# Altium PCB EQ.PcbDoc
Units mm, origin at the board's own origin, x right, y up, seen from the top; angles counter-clockwise.
Board outline 56.7 x 64.3 mm, 2 copper layers (Top Layer, Bottom Layer); 61 components, 38 nets, 171 pads, 13 vias.
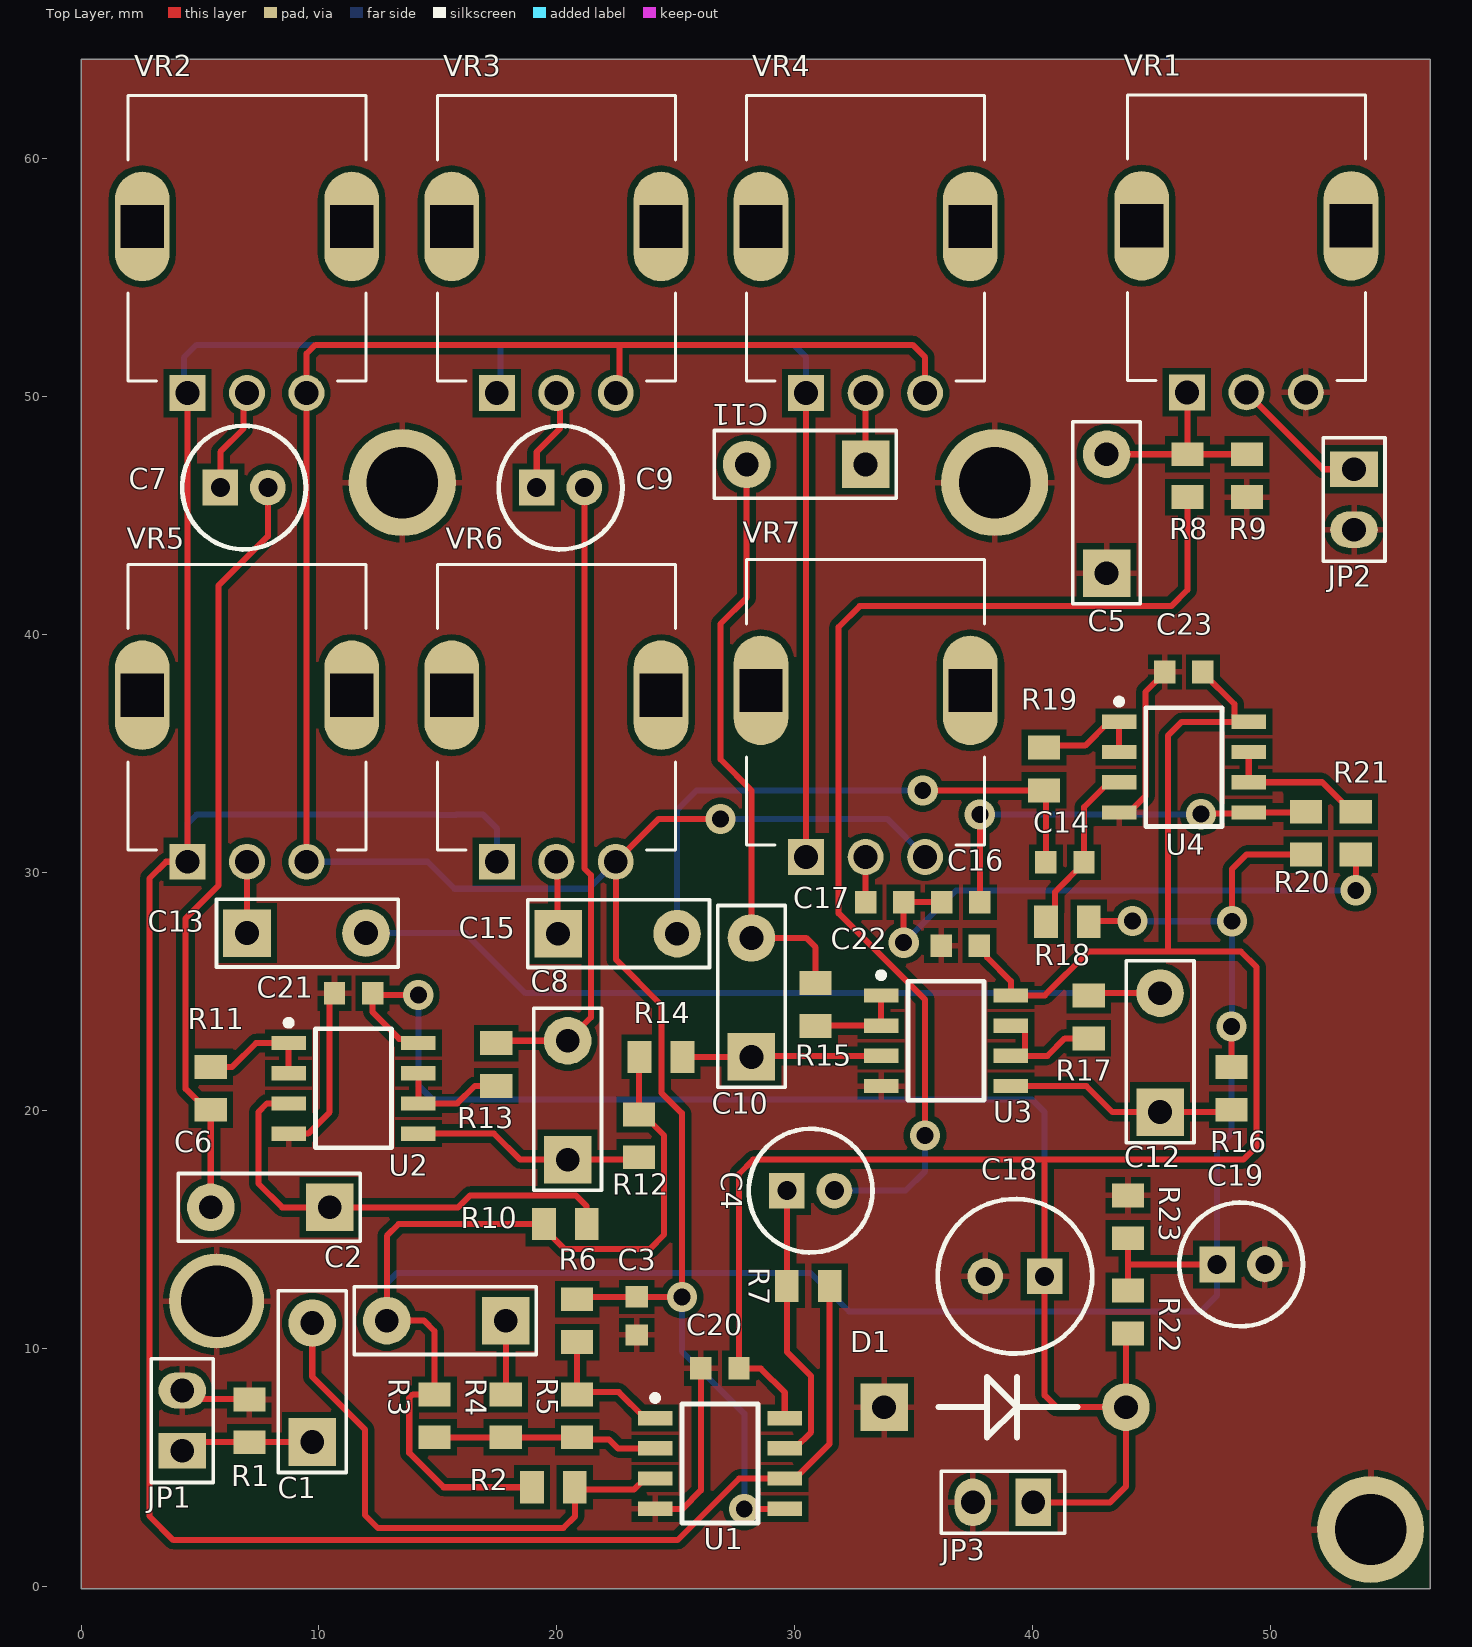
[diagram p0: Top Layer view]
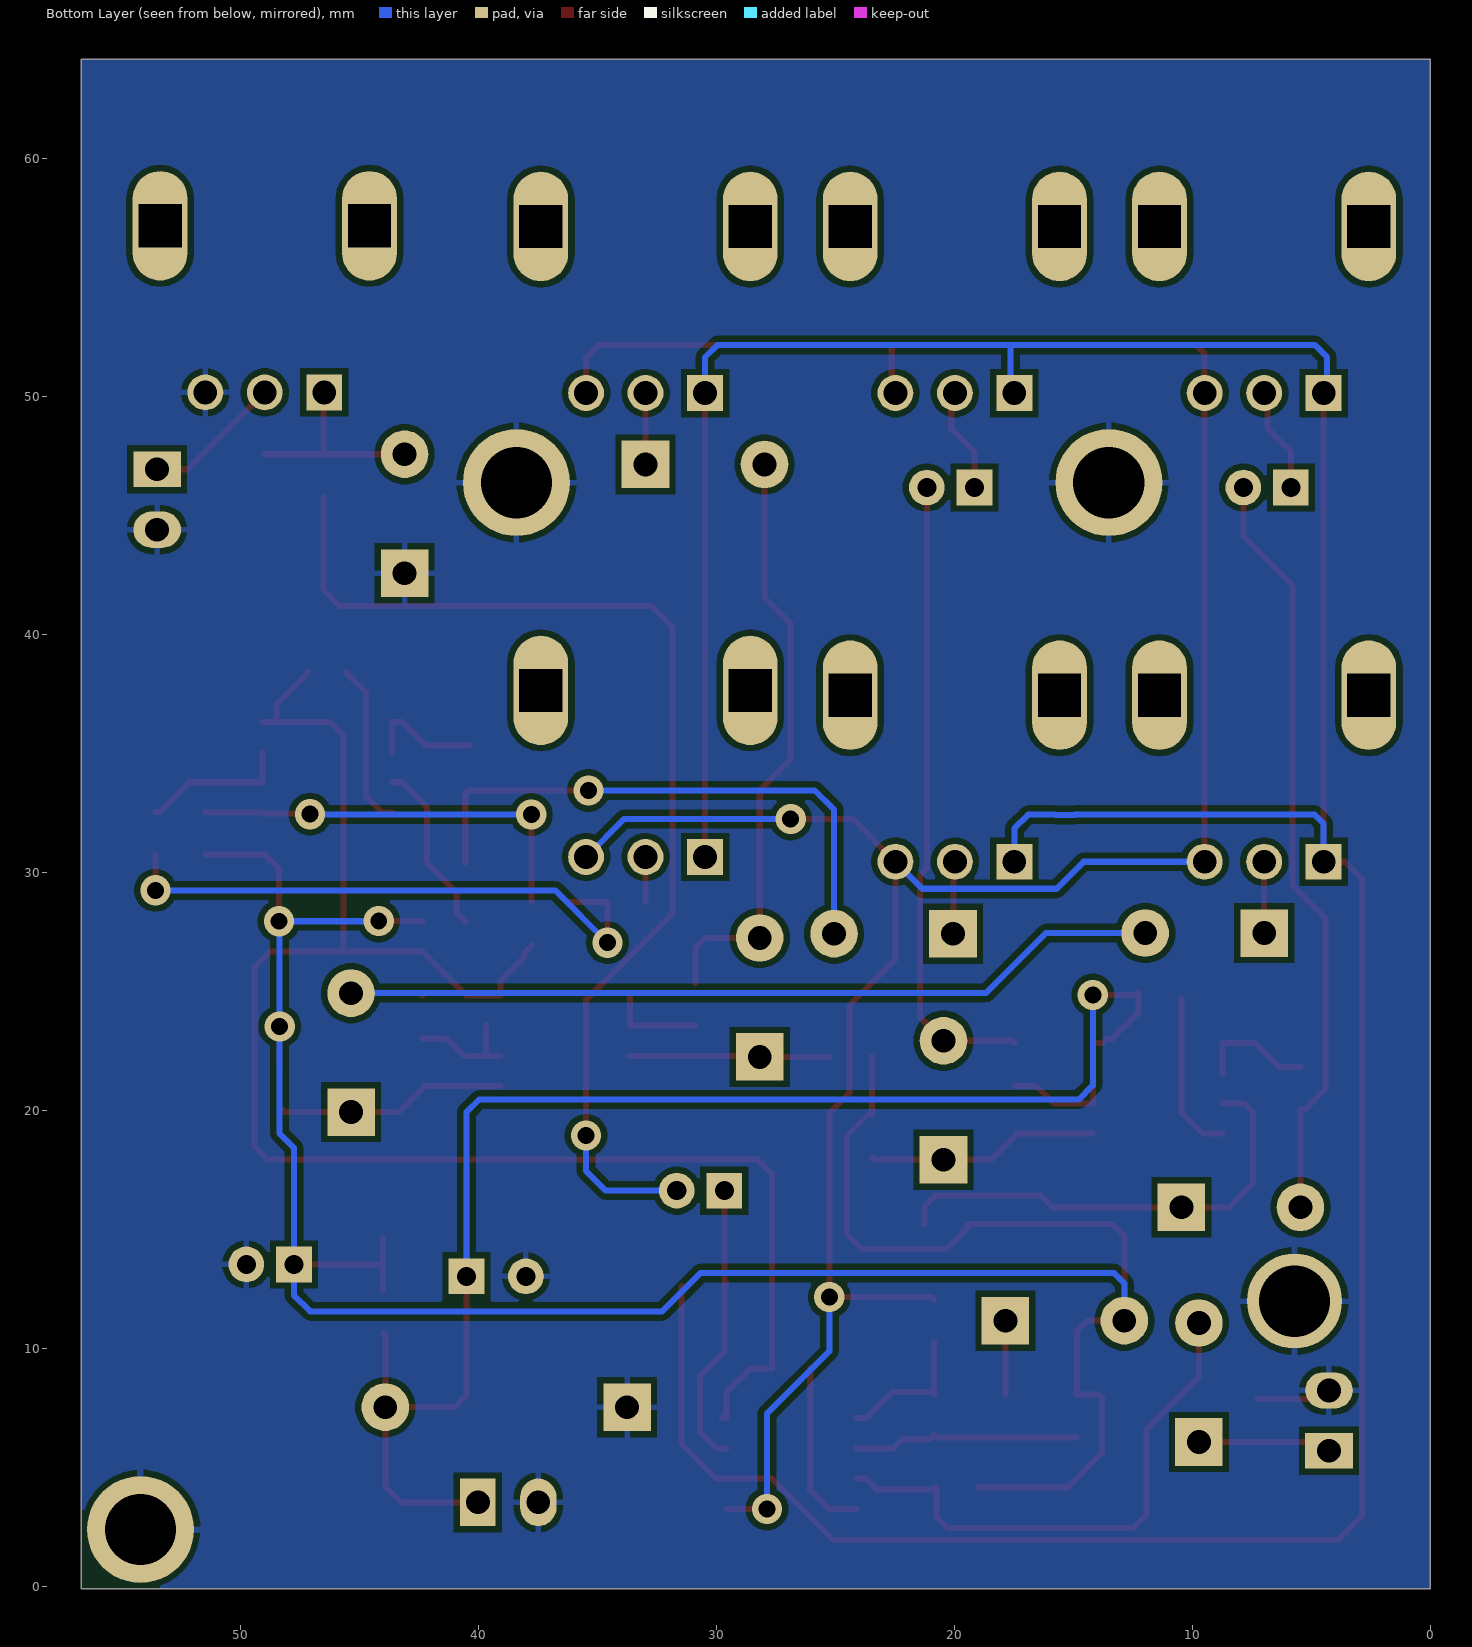
[diagram p1: Bottom Layer view, seen from below]
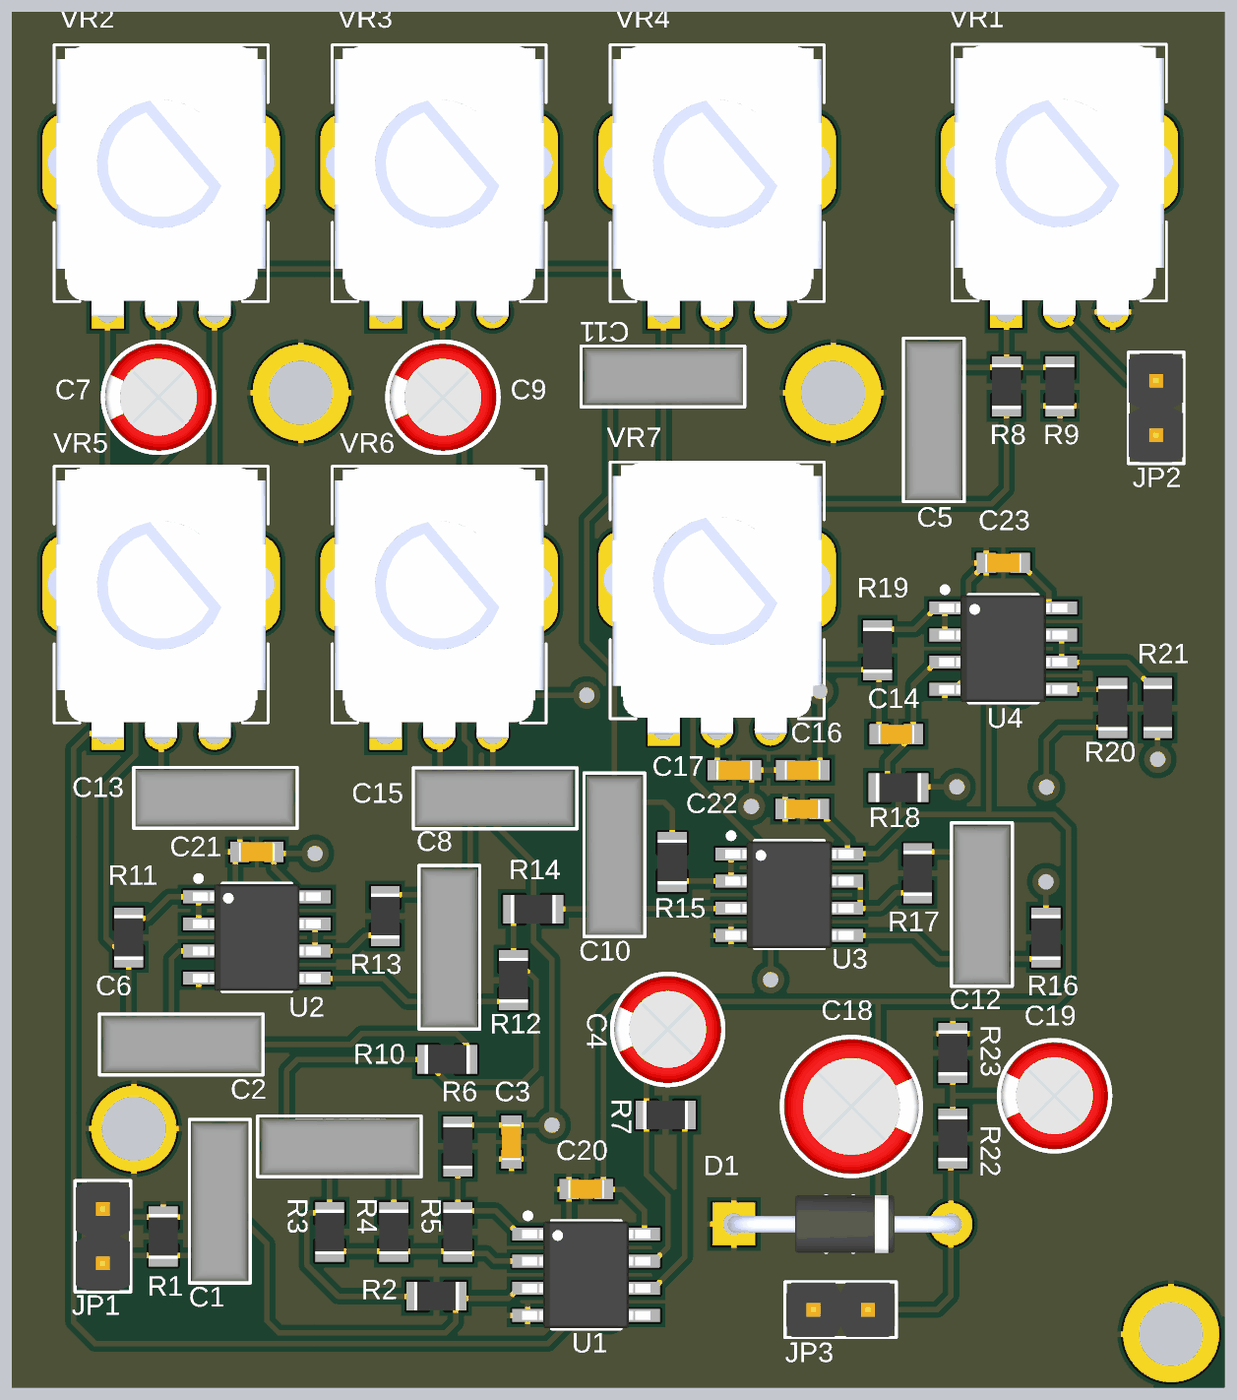
[diagram p2: 3D render of the assembled board from above, using the file's embedded part models]

## Layer stack, top to bottom
Top Solder: solder mask 0.0102, Solder Resist, Dk 3.5
Top Layer: signal copper 0.0356
Dielectric 1: dielectric 0.32, FR-4, Dk 4.8
Bottom Layer: signal copper 0.0356
Bottom Solder: solder mask 0.0102, Solder Resist, Dk 3.5

## Board outline
0,-0.1 0,64.2 56.7,64.2 56.7,-0.1

## Design rules (kind name [scope] priority, off if disabled: settings)
Clearance [All] p1: gap=0.254 ignorepadtopadclearanceinfootprint=FALSE except(0: Arc-Hole Track-Hole SMDPad-Hole THPad-Hole Via-Hole Fill-Hole Poly-Hole Region-Hole Text-Hole)
HoleSize [All] p1: absolutevalues=TRUE maxlimit=5 minlimit=0.025 maxpercent=80.000 minpercent=20.000
PolygonConnect [All] p1: connectstyle=Relief reliefconductorwidth=0.254 reliefentries=4 polygonreliefangle="90 Angle" airgapwidth=0.254
RoutingVias [All] p1: holewidth=0.711 width=1.27 viastyle="Through Hole" minholewidth=0.711 minwidth=1.27 maxholewidth=0.711 maxwidth=1.27
SilkToSolderMaskClearance [IsPad] p1: minsilkscreentomaskgap=0.2 clearancetoexposedcopper=TRUE
SolderMaskExpansion [All] p1: expansion=0.102 istentingtop=FALSE
SupplyNets "Schematic Supply Nets_2" [InNet('VCC/2')] p1: voltage=0.000
SupplyNets "Schematic Supply Nets_1" [InNet('GND')] p2: voltage=0.000
SupplyNets "Schematic Supply Nets" [InNet('VCC')] p3: voltage=0.000
Width [All] p1: maxlimit=0.254 minlimit=0.254 preferedwidth=0.254
28 further rules are at their usual default settings.

## Classes and differential pairs
component class EQ: C1 C2 C3 C4 C5 C6 C7 C8 C9 C10 C11 C12 C14 C15 C22 C23 D1 JP1 JP2 JP3 R1 R2 R3 R4 R5 R6 R7 R8 R9 R10 R11 R12 R13 R14 R15 R16 R17 R18 R19 R22 R23 U1 U2 U3 U4 VR1 VR2 VR3 VR4 VR5 VR6 VR7

## Components (designator, comment, footprint, x,y, rotation, side; value= is the part's Value field where it differs from the comment)
C1 "10nF" CAP_FILM 9.717,6.075 r90 top
C2 "10nF" CAP_FILM 17.852,11.175 r180 top
C3 "150pF" CAP_0603 23.352,11.375 r270 top
C4 "1uF" CAP_TH 30.663,16.64 r180 top
C5 "10nF" CAP_FILM 43.102,42.59 r90 top
C6 "47nF" CAP_FILM 10.452,15.94 r180 top
C7 "2.2uF" CAP_TH 6.852,46.19 r180 top
C8 "33nF" CAP_FILM 20.452,17.94 r90 top
C9 "1uF" CAP_TH 20.152,46.19 r180 top
C10 "6.8nF" CAP_FILM 28.175,22.263 r90 top
C11 "150nF" CAP_FILM 32.975,47.163 r180 top
C12 "3.3nF" CAP_FILM 45.352,19.94 r90 top
C13 "68nF" CAP_FILM 6.975,27.463 r0 top
C14 "680pF" CAP_0603 41.352,30.44 r180 top
C15 "22nF" CAP_FILM 20.052,27.44 r0 top
C16 "180pF" CAP_0603 36.975,28.763 r180 top
C17 "1nF" CAP_0603 33.775,28.763 r0 top
C18 "100uF" CAP_100uF 39.252,13.04 r0 top
C19 "47uF" CAP_TH 48.752,13.54 r180 top
C20 "100nF" CAP_0603 26.852,9.175 r180 top
C21 "100nF" CAP_0603 11.452,24.94 r180 top
C22 "100nF" CAP_0603 36.952,26.94 r180 top
C23 "100nF" CAP_0603 46.352,38.44 r180 top
D1 "1N4001" 1N4001 33.752,7.54 r0 top
JP1 "INPUT" Header_2 4.252,6.975 r90 top
JP2 "OUTPUT" Header_2 53.502,45.69 r270 top
JP3 "Alimentation" Header_2 38.752,3.54 r180 top
R1 "2.2M" RES_0805 7.075,6.963 r270 top
R2 "470K" RES_0805 19.852,4.175 r180 top
R3 "10K" RES_0805 14.852,7.175 r90 top
R4 "1K" RES_0805 17.852,7.175 r90 top
R5 "10K" RES_0805 20.852,7.175 r270 top
R6 "10K" RES_0805 20.852,11.175 r270 top
R7 "10K" RES_0805 30.563,12.64 r180 top
R8 "10K" RES_0805 46.502,46.69 r270 top
R9 "10K" RES_0805 49.002,46.69 r270 top
R10 "120k" RES_0805 20.352,15.24 r0 top
R11 "470R" RES_0805 5.452,20.94 r90 top
R12 "100k" RES_0805 23.452,18.94 r270 top
R13 "470R" RES_0805 17.452,21.94 r270 top
R14 "100K" RES_0805 24.375,22.263 r0 top
R15 "1K" RES_0805 30.875,24.463 r270 top
R16 "100K" RES_0805 48.352,20.94 r270 top
R17 "1K" RES_0805 42.352,23.94 r270 top
R18 "100K" RES_0805 41.452,27.94 r180 top
R19 "1K" RES_0805 40.475,34.363 r90 top
R20 "100K" RES_0805 51.475,31.663 r90 top
R21 "1K" RES_0805 53.575,31.663 r90 top
R22 "47K" RES_0805 44.002,11.54 r90 top
R23 "47K" RES_0805 44.002,15.54 r90 top
U1 "TL072" TL072 26.852,5.175 r0 top
U2 "" TL072 11.452,20.94 r0 top
U3 "TL072" TL072 36.352,22.94 r0 top
U4 "TL072" TL072 46.352,34.44 r0 top
VR1 "POT" PT01-D120D-B503 48.977,57.19 r0 top
VR2 "POT" PT01-D120D-B503 6.975,57.163 r0 top
VR3 "POT" PT01-D120D-B503 19.975,57.163 r0 top
VR4 "POT" PT01-D120D-B503 32.975,57.163 r0 top
VR5 "POT" PT01-D120D-B503 6.975,37.463 r0 top
VR6 "POT" PT01-D120D-B503 19.975,37.463 r0 top
VR7 "POT" PT01-D120D-B503 32.975,37.663 r0 top

## Footprints (in the part's own frame and the unit in brackets; to place one, negate y for a bottom-side part, rotate by r counter-clockwise, add the part's x,y. Pads: shape width x height; smd on the part's side, far side on the other; paste and mask are expansions set on the pad)
1N4001 [mm]
  rect 2x2 hole 1: 1(0,0)
  round 2 hole 1: 2(10.16,0)
  silkscreen extent 2.29,-1.27 8.13,1.27, body extent -0.28,-1.35 10.67,1.35, height 2.78
CAP_100uF [mm]
  rect 1.5x1.5 hole 0.8: 1(1.25,0)
  round 1.5 hole 0.8: 2(-1.25,0)
  silkscreen extent -3.25,-3.25 3.25,3.25, body extent -3.14,-3.14 3.14,3.15, height 11.04
CAP_0603 [mm]
  rect 0.9x0.95 smd: 1(-0.8,0) 2(0.8,0)
  body extent -0.85,-0.45 0.85,0.45, height 0.55
CAP_FILM [mm]
  rect 2x2 hole 1: 1(0,0)
  round 2 hole 1: 2(5,0)
  silkscreen extent -1.28,-1.42 6.36,1.42, body extent -1.2,-1.3 6.2,1.31, height 6.6
CAP_TH [mm]
  rect 1.5x1.5 hole 0.8: 1(1,0)
  round 1.5 hole 0.8: 2(-1,0)
  silkscreen extent -2.6,-2.6 2.6,2.6, body extent -2.5,-2.5 2.49,2.5, height 11.04
Header_2 [mm]
  rect 1.5x2 hole 1: 1(-1.27,0)
  oval 1.524x2 hole 1: 2(1.27,0)
  silkscreen extent -2.6,-1.3 2.6,1.3, body extent -2.54,-1.27 2.54,1.27, height 8.54
PT01-D120D-B503 [mm]
  rect 1.508x1.508 hole 1: 1(-2.5,-7)
  round 1.508 hole 1: 2(0,-7) 3(2.5,-7)
  oval 2.3x4.6 hole 1.8 square: S1(-4.4,0) S2(4.4,0)
  silkscreen extent -5,-6.5 5,5.5, body extent -5.64,-7.21 5.64,5.44, height 15.1
RES_0805 [mm] "Chip Resistor, 2-Leads, Body 2.00x1.25mm, IPC Medium Density"
  rect 1x1.35 smd: 1(-0.9,0) 2(0.9,0)
  body extent -1.05,-0.67 1.05,0.67, height 0.6
TL072 [mm] "SOIC, 8-Leads, Body 4.91x3.90mm, Pitch 1.27mm, IPC Medium Density"
  rect 1.45x0.6 smd: 1(-2.725,1.905) 2(-2.725,0.635) 3(-2.725,-0.635) 4(-2.725,-1.905) 5(2.725,-1.905) 6(2.725,-0.635) 7(2.725,0.635) 8(2.725,1.905)
  silkscreen extent -2.85,-2.5 1.6,2.88, body extent -3,-2.5 3,2.5, height 1.75

## Part data
C1 C2 C3 C5 C6 C8 C10 C11 C12 C13 C14 C15 C16 C17 C20 C21 C22 C23: library part "CAP NP"
C4 C7 C9 C18 C19: library part CAP
D1: library part DIODE
JP1 JP2 JP3: library part "HEADER 2"
R1 R2 R3 R4 R5 R6 R7 R8 R9 R10 R11 R12 R13 R14 R15 R16 R17 R18 R19 R20 R21 R22 R23: library part R
U2: library part TL072

## Free pads (board coordinates)
  round 4 hole 3: 6(5.7,12)
  round 4.5 hole 3: 6(13.5,46.4) 6(38.4,46.4) 6(54.2,2.4)

## Via types
v1: diameter 1.27, hole 0.711, Top Layer to Bottom Layer, tented both sides, 13 vias

## Nets (pads, with @x,y where several pads share a name; then routed paths per layer and width w, separated by ;. In a path a pad name is that pad's centre, name@x,y a point inside that pad or via, vN(x,y) a via of type N, cw(c..) or ccw(c..) an arc to the next point about the centre after c; other vN are vias at no path point)
1kHz: C13.1 VR5.2 | length 3.2
  Top Layer w0.254: VR5.2@6.827,30.44 6.975,30.292 6.975,27.763 C13.1@7.275,27.463
4kHz: C15.1 VR6.2 | length 3
  Top Layer w0.254: VR6.2@20.027,30.44 20.027,27.465 C15.1
8kHz: C17.1 VR7.2 | length 1.9
  Top Layer w0.254: C17.1 VR7.2
62.5Hz: C7.1 VR2.2 | length 4.4
  Top Layer w0.254: C7.1 5.852,47.69 6.827,48.665 VR2.2@6.827,50.19
125Hz: C9.1 VR3.2 | length 4.4
  Top Layer w0.254: C9.1 19.152,47.69 20.127,48.665 VR3.2@20.127,50.163
500Hz: C11.1 VR4.2 | length 3
  Top Layer w0.254: C11.1 VR4.2
EQ+: C3.1 R6.1 U1.5 VR2.3 VR3.3 VR4.3 VR5.3 VR6.3 VR7.3 | length 115.4
  Top Layer w0.254: VR5.3 VR2.3 9.475,51.813 9.852,52.19 22.627,52.19 ; R6.1 20.952,12.175 C3.1 23.362,12.165 v1(25.252,12.165) 25.252,19.894 24.394,20.752 24.394,24.444 22.475,26.363 VR6.3 24.275,32.263 v1(26.875,32.263) ; VR3.3@22.627,50.19 22.627,52.19 ; v1(27.875,3.263) 27.878,3.267 29.574,3.267 U1.5 ; VR4.3 35.475,51.663 34.948,52.19 22.627,52.19
  Bottom Layer w0.254: VR5.3 14.562,30.463 15.697,29.328 21.34,29.328 VR6.3 ; v1(25.252,12.165) 25.252,9.886 27.875,7.263 27.875,3.444 27.694,3.263 v1(27.875,3.263) ; v1(26.875,32.263) 33.875,32.263 VR7.3
EQ-: R7.1 U1.6 VR2.1 VR3.1 VR4.1 VR5.1 VR6.1 VR7.1 | length 153.2
  Top Layer w0.254: VR2.1 VR5.1 3.575,30.463 2.871,29.759 2.871,2.967 3.883,1.955 25.067,1.955 27.652,4.54 U1.6 30.002,4.54 31.463,6.001 R7.1 ; VR7.1 VR4.1
  Bottom Layer w0.254: VR2.1@4.327,50.19 4.327,51.665 4.852,52.19 17.627,52.19 ; VR5.1 4.475,32.063 4.852,32.44 14.915,32.44 14.931,32.424 15.773,32.424 15.789,32.44 16.898,32.44 17.475,31.863 VR6.1 ; VR3.1@17.627,50.19 17.627,52.19 ; VR4.1 30.475,51.663 29.948,52.19 17.627,52.19
GND: C3.2 C5.1 C18.2 C19.2 C20.2 C21.2 C22.2 C23.2 D1.1 JP1.2 JP2.2 JP3.2 pad.6 R1.1 R9.2 R23.2 U1.4 U2.4 U3.4 U4.4 VR1.3 | length 24.4
  Top Layer w0.254: JP1.2 4.622,7.875 R1.1@7.252,7.875 ; U2.4 9.547,19.035 10.452,19.94 C21.2@10.452,24.715 ; U1.4 25.282,3.27 26.052,4.04 C20.2 ; U4.4 44.052,32.535 44.733,33.216 44.733,37.596 45.552,38.415 C23.2
INPUT: C1.1 JP1.1 R1.2 | length 5.6
  Top Layer w0.254: JP1.1 4.622,6.075 7.252,6.075 C1.1
NetC1_2: C1.2 R2.1 U1.3 | length 23.1
  Top Layer w0.254: C1.2 9.717,8.821 11.93,6.608 11.93,3.008 12.475,2.463 20.275,2.463 20.752,2.94 R2.1 20.852,4.075 23.237,4.075 23.702,4.54 U1.3
NetC2_1: C2.1 R4.2 | length 3.1
  Top Layer w0.254: R4.2 C2.1
NetC4_1: C4.1 R7.2 U1.7 | length 12
  Top Layer w0.254: R7.2@29.563,12.74 R7.2 29.663,9.867 30.683,8.847 30.683,6.491 30.002,5.81 U1.7 ; R7.2@29.663,12.74 C4.1
NetC4_2: C4.2 R8.2 | length 47.7
  Top Layer w0.254: v1(35.475,18.963) 35.475,24.663 31.84,28.298 31.84,40.328 32.721,41.209 45.821,41.209 46.502,41.89 R8.2
  Bottom Layer w0.254: C4.2 34.652,16.64 35.475,17.463 v1(35.475,18.963)
NetC5_2: C5.2 R8.1 R9.1 VR1.1 | length 8.4
  Top Layer w0.254: C5.2 R8.1 R9.1 ; VR1.1 46.502,50.165 R8.1@46.502,47.69
NetC6_1: C6.1 R10.2 U2.3 | length 19.8
  Top Layer w0.254: U2.3 7.817,20.305 7.452,19.94 7.452,16.94 8.452,15.94 C6.1 15.852,15.94 16.357,16.445 20.793,16.445 21.252,15.986 R10.2
NetC6_2: C6.2 C7.2 R11.1 | length 32.2
  Top Layer w0.254: C6.2 R11.1 5.277,20.04 4.396,20.921 4.396,28.084 5.775,29.463 5.775,42.063 7.852,44.14 C7.2
NetC8_1: C8.1 R12.2 U2.5 | length 9.8
  Top Layer w0.254: U2.5 17.357,19.035 18.452,17.94 C8.1 23.352,17.94 R12.2
NetC8_2: C8.2 C9.2 R13.1 | length 26.8
  Top Layer w0.254: R13.1 17.552,22.94 C8.2 21.433,23.921 21.433,29.9 21.152,30.181 C9.2
NetC10_1: C10.1 R14.2 U3.3 | length 8.4
  Top Layer w0.254: R14.2 C10.1 28.217,22.305 U3.3
NetC10_2: C10.2 C11.2 R15.1 | length 25.3
  Top Layer w0.254: C11.2 27.975,41.563 26.875,40.463 26.875,34.763 28.175,33.463 C10.2 30.475,27.263 30.875,26.863 R15.1
NetC12_1: C12.1 R16.2 U3.5 | length 9.8
  Top Layer w0.254: U3.5 42.257,21.035 43.352,19.94 C12.1 48.152,19.94 R16.2@48.352,20.14
NetC12_2: C12.2 C13.2 R17.1 | length 37.5
  Top Layer w0.254: R17.1 42.452,24.94 C12.2
  Bottom Layer w0.254: C13.2 16.15,27.463 18.673,24.94 C12.2
NetC14_1: C14.1 R18.2 U4.3 | length 7.4
  Top Layer w0.254: R18.2 40.925,28.313 40.925,29.188 42.152,30.415 C14.1 42.152,32.755 43.202,33.805 U4.3
NetC14_2: C14.2 C15.2 R19.1 | length 24
  Top Layer w0.254: v1(35.375,33.463) 40.429,33.463 40.552,33.34 C14.2
  Bottom Layer w0.254: C15.2 25.052,32.64 25.875,33.463 v1(35.375,33.463)
NetC16_1: C16.1 R20.2 U4.5 | length 17.4
  Top Layer w0.254: C16.1 v1(37.775,32.447) ; v1(47.075,32.463) 47.111,32.499 49.041,32.499 U4.5 51.447,32.535 R20.2
  Bottom Layer w0.254: v1(37.775,32.447) 37.783,32.455 47.067,32.455 v1(47.075,32.463)
NetC16_2: C16.2 C17.2 R21.1 | length 24.7
  Top Layer w0.254: v1(34.575,27.063) C17.2 C16.2 ; v1(53.575,29.263) R21.1
  Bottom Layer w0.254: v1(34.575,27.063) 36.775,29.263 v1(53.575,29.263)
NetR3_1: R3.1 R4.1 R5.2 U1.2 | length 9.6
  Top Layer w0.254: R3.1 R4.1 20.752,6.275 20.852,6.375 21.052,6.175 22.196,6.175 22.561,5.81 U1.2
NetR5_1: R5.1 R6.2 U1.1 | length 5.9
  Top Layer w0.254: R5.1 R6.2 ; R5.1@20.852,8.175 22.607,8.175 23.702,7.08 U1.1
NetR11_2: R11.2 U2.1 U2.2 | length 5
  Top Layer w0.254: R11.2 6.352,21.84 7.357,22.845 U2.1 U2.2
NetR13_2: R13.2 U2.6 U2.7 | length 4.8
  Top Layer w0.254: U2.7 U2.6 15.817,20.305 16.552,21.04 R13.2
NetR15_2: R15.2 U3.1 U3.2 | length 4
  Top Layer w0.254: R15.2 30.887,23.575 U3.2 U3.1
NetR17_2: R17.2 U3.6 U3.7 | length 4.8
  Top Layer w0.254: U3.6 40.617,22.305 41.352,23.04 R17.2 ; U3.6@39.677,22.305 U3.7@39.677,23.575
NetR19_2: R19.2 U4.1 U4.2 | length 5
  Top Layer w0.254: R19.2@40.352,35.34 42.197,35.34 43.202,36.345 U4.1 U4.2
NetR21_2: R21.2 U4.6 U4.7 | length 6.3
  Top Layer w0.254: U4.7 U4.6 52.158,33.805 53.4,32.563 R21.2
OUTPUT: JP2.1 VR1.2 | length 5.9
  Top Layer w0.254: VR1.2 52.207,46.96 JP2.1
VCC: C18.1 C20.1 C21.1 C22.1 C23.1 D1.2 JP3.1 R22.1 U1.8 U2.8 U3.8 U4.8 | length 138
  Top Layer w0.254: v1(14.175,24.863) 12.329,24.863 C21.1 12.252,24.14 13.374,23.018 13.579,23.018 13.752,22.845 U2.8 ; C20.1@27.64,9.162 28.576,9.162 29.575,8.163 29.575,7.257 29.664,7.167 29.752,7.08 U1.8 ; C20.1 27.652,17.34 28.252,17.94 40.502,17.94 ; C22.1 38.075,26.617 38.075,26.447 39.079,25.443 39.079,25.018 39.165,24.933 U3.8@39.252,24.845 ; U3.8 U3.8@39.252,24.845 ; JP3.1 43.252,3.54 43.912,4.2 D1.2 ; R22.1 43.912,10.55 D1.2 ; C23.1 47.152,38.415 48.479,37.088 48.479,36.518 U4.8@48.652,36.345 ; U4.8 U4.8@48.652,36.345 ; U3.8@39.252,24.845 40.507,24.845 42.352,26.69 45.675,26.69 ; 40.502,17.94 C18.1 40.502,8.04 41.002,7.54 D1.2 ; 40.502,17.94 48.852,17.94 49.408,18.496 49.408,26.03 48.748,26.69 45.675,26.69 ; 45.675,26.69 45.675,35.763 46.257,36.345 U4.8@48.652,36.345
  Bottom Layer w0.254: v1(14.175,24.863) 14.175,21.063 14.775,20.463 39.975,20.463 40.502,19.936 C18.1
VCC/2: C2.2 C19.1 R2.2 R3.2 R10.1 R12.1 R14.1 R16.1 R18.1 R20.1 R22.2 R23.1 | length 111.1
  Top Layer w0.254: R2.2 15.238,4.175 13.795,5.618 13.795,7.926 13.944,8.075 R3.2 14.852,10.74 14.417,11.175 C2.2 12.852,14.74 13.352,15.24 R10.1 19.452,15.065 20.333,14.184 23.896,14.184 24.508,14.796 24.508,18.959 23.627,19.84 R12.1 23.452,22.24 R14.1 ; R18.1 42.387,27.975 v1(44.187,27.975) ; R22.2 44.002,13.54 ; R23.1 44.002,13.54 ; C19.1 44.002,13.54 ; R16.1 v1(48.352,23.54) ; v1(48.375,27.963) 48.375,30.163 48.975,30.763 R20.1
  Bottom Layer w0.254: C2.2 12.852,12.74 13.293,13.181 30.657,13.181 32.275,11.563 47.075,11.563 47.752,12.24 C19.1 47.752,18.44 48.352,19.04 v1(48.352,23.54) 48.364,23.552 48.364,27.952 v1(48.375,27.963) v1@44.175,27.963
pads on no net: VR1.S1 VR1.S2 VR2.S1 VR2.S2 VR3.S1 VR3.S2 VR4.S1 VR4.S2 VR5.S1 VR5.S2 VR6.S1 VR6.S2 VR7.S1 VR7.S2

## Polygon pours and split planes (outlines as drawn)
GND on Top Layer "GND_TOP" (solid, remove dead copper, pour order 4): 0,-0.1 0,64.2 56.7,64.2 56.7,-0.1
GND on Bottom Layer "GND_BOT" (solid, remove dead copper, pour order 5): 0,-0.1 0,64.2 56.7,64.2 56.7,-0.1

## Silkscreen, mask and mechanical layers (free items; w line width, h text height)
Mechanical 15:
  the board outline again, w0.254